# Altium PCB 60ghz radar pcb.PcbDoc (part 2 of 2)
Units mil, origin at the board's own origin, x right, y up, seen from the top; angles counter-clockwise.
Board outline 1181.1 x 787.4 mil, 4 copper layers (Top Layer, Mid Layer 1, Mid Layer 2, Bottom Layer), stack 61.811 mil thick; 51 components, 49 nets, 258 pads, 81 vias.
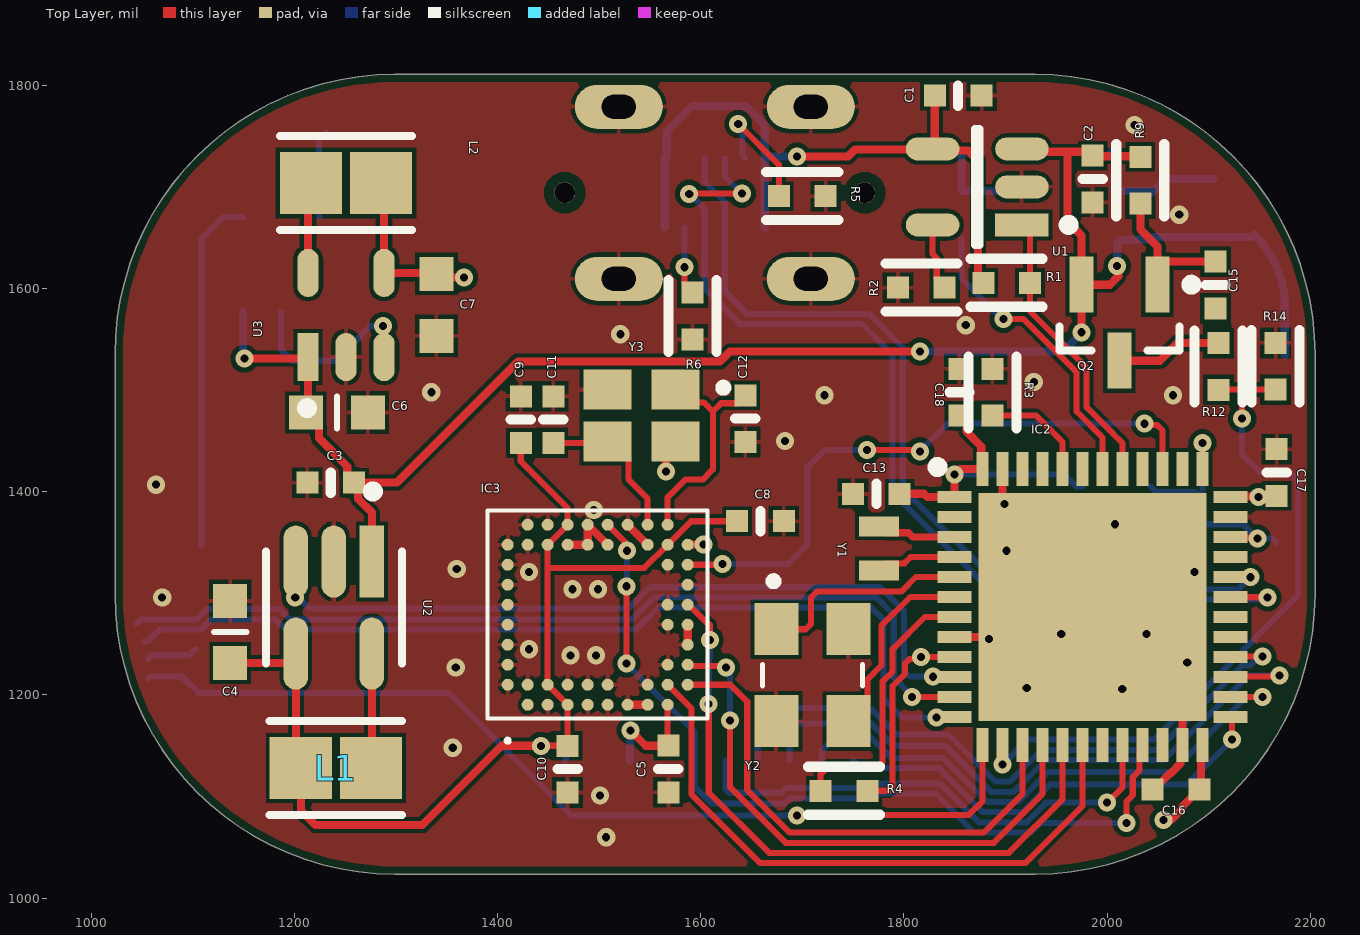
[diagram p0: Top Layer view]

## Silkscreen, mask and mechanical layers (free items; w line width, h text height) (continued)
Bottom Overlay: (continued)
  text "MOSI" at 1666.69,1224 h30 r90
  text "MISO" at 1697.69,1224 h30 r90
  text "1.8V" at 1477.69,1214 h30 r90
  text "CLK" at 1727.69,1211 h30 r90
  text "INT" at 1637,1198 h30 r90
  text "SS" at 1758.69,1194 h30 r90
  text "3V" at 1539.67,1190 h30 r90
  text "G" at 1508,1162.31 h30
Mechanical 1:
  lines w1: 1929.13,1023.62 ccw(c1929.13,1299.21) 2204.72,1299.21 2204.72,1535.43 ccw(c1929.13,1535.43) 1929.13,1811.02 1299.21,1811.02 ccw(c1299.21,1535.43) 1023.62,1535.43 1023.62,1299.21 ccw(c1299.21,1299.21) 1299.21,1023.62 1929.13,1023.62 ; 1929.13,1023.62 1929.13,1023.62